# Altium PCB Power_Board-V1.0.PcbDoc (part 2 of 4)
Units mm, origin at the board's own origin, x right, y up, seen from the top; angles counter-clockwise.
Board outline 64.6 x 83.5 mm, 4 copper layers (Top Layer, GND1, GND2, Bottom Layer), stack 0.603 mm thick; 188 components, 131 nets, 487 pads, 123 vias.
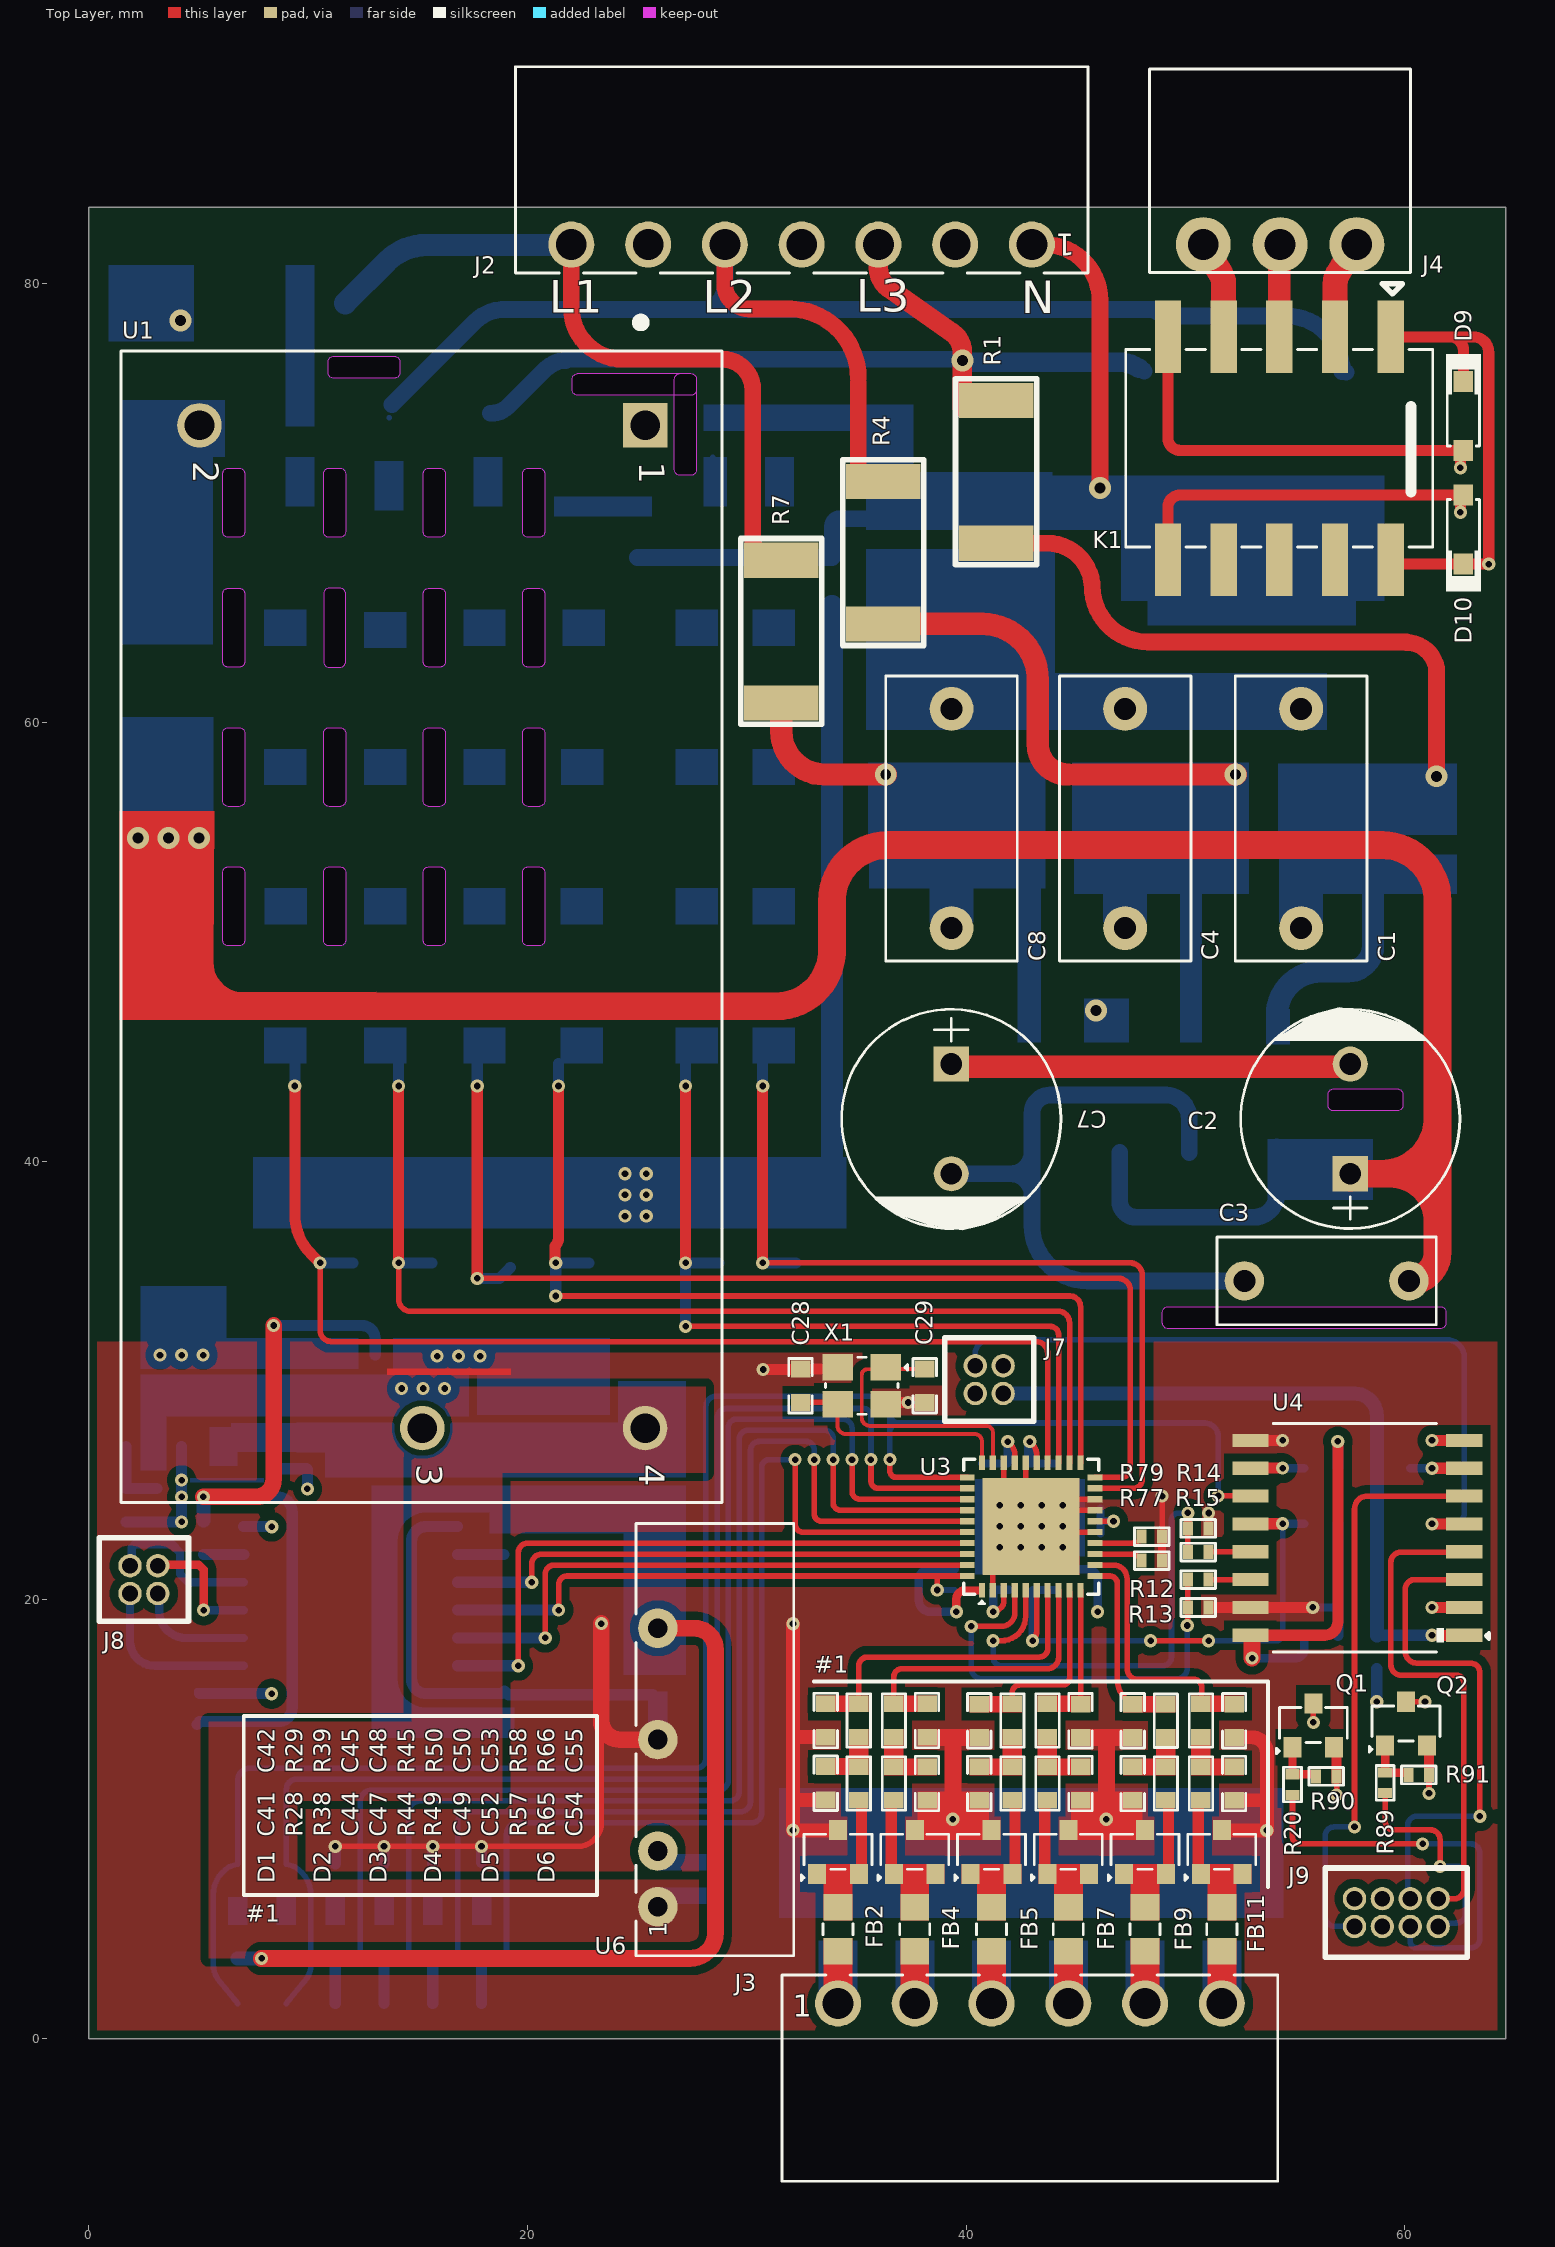
[diagram p0: Top Layer view]

## Part data (continued)
C63: library part GRM188Z71A475KE15D, "CAP CER 4.7UF 10V X7R 0603", Case/Package=0603, LCSC Part Number=C913474, Manufacturer=Murata, Max Operating Temperature=125°C, Min Operating Temperature=-55°C, Tolerance=10%, Voltage Rating=10V, ComponentLink1Description=https://datasheet.octopart.com/GRM188Z71A475KE15D-Murata-datasheet-149523299.pdf?src-supplier=Newark, ComponentLink1URL=https://datasheet.octopart.com/GRM188Z71A475KE15D-Murata-datasheet-149523299.pdf?src-supplier=Newark, ComponentLink2Description=https://datasheet.octopart.com/GRM188Z71A475KE15D-Murata-datasheet-165579666.pdf?src-supplier=TME, ComponentLink2URL=https://datasheet.octopart.com/GRM188Z71A475KE15D-Murata-datasheet-165579666.pdf?src-supplier=TME, Height=950um, Item Type=Capacitors, Length=1.6mm, Manufacturer Part Number=GRM188Z71A475KE15D, Material=4241ConductorMaterial, Pricing="1=0.24, 10=0.1, 50=0.1, 100=0.063, 1000=0.055, 10000=0.041 (USD)", RoHS=Yes, RoHS Compliant=Yes, Stock=33218, Supplier=Mouser, Thickness=800um, Width=800um
D1 D2 D3 D4 D5 D6: "DIODE ARR GP 100V 215MA TO-236AB", Breakdown Voltage=75V, Forward Current=125mA, Forward Voltage=1.25V, LCSC Part Number=C2500, Manufacturer=Nexperia, Max Forward Surge Current (Ifsm)=500mA, Max Operating Temperature=150°C, Max Repetitive Reverse Voltage (Vrrm)=100V, Max Reverse Current=500nA, ComponentLink1Description=http://www.farnell.com/datasheets/953882.pdf?src-supplier=Farnell, ComponentLink1URL=http://www.farnell.com/datasheets/953882.pdf?src-supplier=Farnell, ComponentLink2Description=http://www.farnell.com/datasheets/953882.pdf?src-supplier=Newark, ComponentLink2URL=http://www.farnell.com/datasheets/953882.pdf?src-supplier=Newark, ComponentLink3Description=https://datasheet.octopart.com/BAV99%2C215-Nexperia-datasheet-10109661.pdf?src-supplier=Element14, ComponentLink3URL=https://datasheet.octopart.com/BAV99%2C215-Nexperia-datasheet-10109661.pdf?src-supplier=Element14, ComponentLink4Description=https://assets.nexperia.com/documents/data-sheet/BAV99_SER.pdf?src-supplier=Digikey, ComponentLink4URL=https://assets.nexperia.com/documents/data-sheet/BAV99_SER.pdf?src-supplier=Digikey, ComponentLink5Description=https://datasheet.octopart.com/BAV99%2C215-Nexperia-datasheet-87580883.pdf?src-supplier=Newark, ComponentLink5URL=https://datasheet.octopart.com/BAV99%2C215-Nexperia-datasheet-87580883.pdf?src-supplier=Newark, Height=1.1mm, Item Type=Diodes, Manufacturer Part Number=BAV99,215, Pins=3NUMBER, Pricing="3000=0.008, 12000=0.0077, 30000=0.0075, 75000=0.0073, 120000=0.007 (USD)", Reverse Voltage=100V, RoHS=Yes, RoHS Compliant=Yes, Stock=20217000, Supplier="Future Electronics"
D9 D10: "DIODE SCHOTTKY 40V 1A SOD123", Average Rectified Current=1A, Capacitance=110pF, Case/Package=SOD-123-2, Forward Voltage=450mV, LCSC Part Number=C82544, Manufacturer=Diodes, Max Forward Surge Current (Ifsm)=25A, Max Operating Temperature=125°C, Max Power Dissipation=450mW, Max Repetitive Reverse Voltage (Vrrm)=40V, Max Reverse Current=50uA, Min Operating Temperature=-65°C, Package Quantity=3000, Supplier Part Number 1=1N5819HW-FDICT-ND, Category="Schottky Diodes", ComponentLink1Description=https://datasheet.ciiva.com/16303/ds30217-16303296.pdf?src-supplier=Future+Electronics, ComponentLink1URL=https://datasheet.ciiva.com/16303/ds30217-16303296.pdf?src-supplier=Future+Electronics, ComponentLink2Description=https://datasheet.ciiva.com/27092/1538419-27092484.pdf?src-supplier=Jameco, ComponentLink2URL=https://datasheet.ciiva.com/27092/1538419-27092484.pdf?src-supplier=Jameco, ComponentLink3Description=https://datasheet.ciiva.com/912/ds30217-912801.pdf?src-supplier=Digi-Key, ComponentLink3URL=https://datasheet.ciiva.com/912/ds30217-912801.pdf?src-supplier=Digi-Key, ComponentLink4Description=https://datasheet.ciiva.com/1177/ds30217-1177089.pdf?src-supplier=Element14, ComponentLink4URL=https://datasheet.ciiva.com/1177/ds30217-1177089.pdf?src-supplier=Element14, ComponentLink5Description=https://datasheet.ciiva.com/912/ds30217-912802.pdf?src-supplier=Digi-Key, ComponentLink5URL=https://datasheet.ciiva.com/912/ds30217-912802.pdf?src-supplier=Digi-Key, ComponentLink6Description=https://datasheet.ciiva.com/912/ds30217-912803.pdf?src-supplier=Digi-Key, ComponentLink6URL=https://datasheet.ciiva.com/912/ds30217-912803.pdf?src-supplier=Digi-Key, ComponentLink7Description=https://datasheet.ciiva.com/8303/ds30217-8303132.pdf?src-supplier=Avnet, ComponentLink7URL=https://datasheet.ciiva.com/8303/ds30217-8303132.pdf?src-supplier=Avnet, ComponentLink8Description=https://datasheet.ciiva.com/25919/ds30217-25919644.pdf?src-supplier=Avnet+Europe, ComponentLink8URL=https://datasheet.ciiva.com/25919/ds30217-25919644.pdf?src-supplier=Avnet+Europe, Contact Plating=Tin,Matte, Current Rating=1A, Element Configuration=Single, Forward Current=1A, Height=1.25mm, Item Type=Diode, Lead Free="Lead Free", Length=2.85mm, Manufacturer Part Number=1N5819HW-7-F, Max Reverse Voltage (DC)=40V, Number of Pins=2, Output Current=1A, Packaging="Tape and Reel", Peak Non-Repetitive Surge Current=25A, Polarity=Standard, Pricing 1="1=0.46000, 10=0.34500, 100=0.19530, 500=0.12936, 1000=0.09918 (USD)", Radiation Hardening=No, REACH SVHC="No SVHC", RoHS=Yes, RoHS Compliant=Yes, Series=-, Supplier 1=Digi-Key, Termination=SMD/SMT, Voltage Rating (DC)=40V, Weight=0.000353oz, Width=1.7mm
FB1 FB2 FB3 FB4 FB5 FB6 FB7 FB8 FB9 FB10 FB11 FB12 FB15: "FERRITE BEAD 1.5 KOHM 0805 1LN", Frequency=100MHz, LCSC Part Number=C413959, Manufacturer=Murata, RMS Current (Irms)=250mA, ComponentLink1Description=https://datasheet.ciiva.com/19454/1845267-19454720.pdf?src-supplier=Jameco, ComponentLink1URL=https://datasheet.ciiva.com/19454/1845267-19454720.pdf?src-supplier=Jameco, ComponentLink2Description=https://datasheet.ciiva.com/14122/amblm21b-data-e-14122891.pdf?src-supplier=Distrelec, ComponentLink2URL=https://datasheet.ciiva.com/14122/amblm21b-data-e-14122891.pdf?src-supplier=Distrelec, ComponentLink3Description=https://datasheet.ciiva.com/6211/l0110s0100blm21b-6211484.pdf?src-supplier=Digikey, ComponentLink3URL=https://datasheet.ciiva.com/6211/l0110s0100blm21b-6211484.pdf?src-supplier=Digikey, ComponentLink4Description=https://datasheet.ciiva.com/6211/l0110s0100blm21b-6211486.pdf?src-supplier=Digikey, ComponentLink4URL=https://datasheet.ciiva.com/6211/l0110s0100blm21b-6211486.pdf?src-supplier=Digikey, ComponentLink5Description=https://datasheet.ciiva.com/6211/l0110s0100blm21b-6211487.pdf?src-supplier=Digikey, ComponentLink5URL=https://datasheet.ciiva.com/6211/l0110s0100blm21b-6211487.pdf?src-supplier=Digikey, ComponentLink6Description=https://datasheet.ciiva.com/16420/l0110s0100blm21b-16420715.pdf?src-supplier=Future+Electronics, ComponentLink6URL=https://datasheet.ciiva.com/16420/l0110s0100blm21b-16420715.pdf?src-supplier=Future+Electronics, ComponentLink7Description=https://datasheet.ciiva.com/17277/l0110s0100blm21b-17277370.pdf?, ComponentLink7URL=https://datasheet.ciiva.com/17277/l0110s0100blm21b-17277370.pdf?, ESR=450mR, Item Type="Ferrite Beads", Lead Free=5697LeadFree, Manufacturer Part Number=BLM21BD152SN1D, Number of Circuits=1NUMBER, Pricing="1=0.21, 10=0.114, 50=0.114, 100=0.102, 1000=0.068, 10000=0.048 (USD)", RoHS=Yes, Shielding=202Shielding, Stock=31999, Supplier=Mouser
J1: "FUSE BLOK CARTRIDGE 125V 10A SMD", LCSC Part Number=C108518, Manufacturer=Littelfuse, ComponentLink1Description=https://datasheet.ciiva.com/3812/01550900m-3812998.pdf?src-supplier=Arrow+Electronics, ComponentLink1URL=https://datasheet.ciiva.com/3812/01550900m-3812998.pdf?src-supplier=Arrow+Electronics, Item Type="Fuse Holders", Lead Free=5697LeadFree, Manufacturer Part Number=01550900M, Pricing="1=2.5, 5=2.072, 10=1.912, 50=1.586, 100=1.4631, 250=1.31448, 500=1.21164, 1000=1.11633, 5000=1.06138 (USD)", Reach SVHC Compliant=4187SVHC, RoHS=Yes, Stock=4038, Supplier=Digikey
J2: "TERM BLOCK HDR 7POS 3.50MM", Manufacturer="Wurth Elektronik", ComponentLink1Description=https://datasheet.octopart.com:443/691322110007-Wurth-Elektronik-datasheet-111088189.pdf?src-supplier=RS+(Formerly+Allied+Electronics), ComponentLink1URL=https://datasheet.octopart.com:443/691322110007-Wurth-Elektronik-datasheet-111088189.pdf?src-supplier=RS+(Formerly+Allied+Electronics), Item Type="Terminal Blocks", Manufacturer Part Number=691322110007, Pricing="1=1.67, 10=1.517, 50=1.4248, 100=1.3032, 465=1.05841 (USD)", Stock=385, Supplier=DigiKey
J3: "TERM BLOCK HDR 6POS 3.50MM", Color=Green, Current=10A, Manufacturer="Wurth Elektronik", Supplier Part Number=732-2773-ND, Voltage=300V, ComponentLink1Description=https://datasheet.octopart.com:443/691322110006-W%C3%BCrth-Elektronik-datasheet-111088189.pdf?src-supplier=Farnell, ComponentLink1URL=https://datasheet.octopart.com:443/691322110006-W%C3%BCrth-Elektronik-datasheet-111088189.pdf?src-supplier=Farnell, ComponentLink2Description=https://datasheet.octopart.com:443/691322110006-W%C3%BCrth-Elektronik-datasheet-12532410.pdf?src-supplier=Farnell, ComponentLink2URL=https://datasheet.octopart.com:443/691322110006-W%C3%BCrth-Elektronik-datasheet-12532410.pdf?src-supplier=Farnell, ComponentLink3Description=https://datasheet.octopart.com:443/691322110006-W%C3%BCrth-Elektronik-Midcom-datasheet-10414363.pdf?src-supplier=Farnell, ComponentLink3URL=https://datasheet.octopart.com:443/691322110006-W%C3%BCrth-Elektronik-Midcom-datasheet-10414363.pdf?src-supplier=Farnell, ComponentLink4Description=https://datasheet.octopart.com:443/691322110006-W%C3%BCrth-Elektronik-Midcom-datasheet-10405066.pdf?src-supplier=Newark, ComponentLink4URL=https://datasheet.octopart.com:443/691322110006-W%C3%BCrth-Elektronik-Midcom-datasheet-10405066.pdf?src-supplier=Newark, Connector Type="PCB, Terminal Block", Contact Gender=Male, Contact Material=Brass, Gender=Male, Height=9.2mm, Item Type="Terminal Blocks", Lead Pitch=3.5mm, Length=10.5mm, Manufacturer Part Number=691322110006, Mounting Technology="Through Hole", Number of Contacts=6, Number of Levels=1, Number of Positions Per Level=6, Number of Rows=1, Packaging=Box, Pins=6, Pitch=3.5052mm, Pricing="1=1.19, 10=1.064, 50=0.9198, 100=0.8226, 250=0.77312, 560=0.7245 (USD)", RoHS=Compliant, Stock=1584, Supplier=DigiKey, Termination=Solder, Width=22.1mm
J4: "TERM BLOCK HDR 3POS 3.50MM", Color=Green, Current=10A, Manufacturer="Wurth Elektronik", Supplier Part Number=732-2770-ND, Voltage=300V, ComponentLink1Description=https://datasheet.octopart.com:443/691322110003-W%C3%BCrth-Elektronik-datasheet-111088189.pdf?src-supplier=Future+Electronics, ComponentLink1URL=https://datasheet.octopart.com:443/691322110003-W%C3%BCrth-Elektronik-datasheet-111088189.pdf?src-supplier=Future+Electronics, ComponentLink2Description=https://datasheet.octopart.com:443/691322110003-W%C3%BCrth-Elektronik-datasheet-12532410.pdf?src-supplier=Farnell, ComponentLink2URL=https://datasheet.octopart.com:443/691322110003-W%C3%BCrth-Elektronik-datasheet-12532410.pdf?src-supplier=Farnell, ComponentLink3Description=https://datasheet.octopart.com:443/691322110003-W%C3%BCrth-Elektronik-Midcom-datasheet-10414363.pdf?src-supplier=Farnell, ComponentLink3URL=https://datasheet.octopart.com:443/691322110003-W%C3%BCrth-Elektronik-Midcom-datasheet-10414363.pdf?src-supplier=Farnell, ComponentLink4Description=https://datasheet.octopart.com:443/691322110003-W%C3%BCrth-Elektronik-Midcom-datasheet-10405066.pdf?src-supplier=Newark, ComponentLink4URL=https://datasheet.octopart.com:443/691322110003-W%C3%BCrth-Elektronik-Midcom-datasheet-10405066.pdf?src-supplier=Newark, Contact Material=Brass, Gender=Male, Height=9.2mm, Item Type="Terminal Blocks", Lead Pitch=3.5mm, Length=10.5mm, Manufacturer Part Number=691322110003, Mounting Technology="Through Hole", Number of Contacts=3, Number of Levels=1, Number of Positions Per Level=3, Number of Rows=1, Packaging=Box, Pins=3, Pitch=3.5052mm, Pricing="1=0.66, 10=0.591, 50=0.5112, 100=0.4572, 250=0.4302, 750=0.4032 (USD)", RoHS=Compliant, Stock=11796, Supplier=DigiKey, Termination=Solder, Width=11.6mm
J7 J8 J9: "Socket Strip, Cuttable, Double Row, 0.050\"x0.050\" Pitch", Manufacturer=SAMTEC, CREATED="JUNE 03,  2014 - WENDY XIN", System=Connector
  J7 J8: PCB DECAL=FW-02-02-L-D-560-150, Supplier 1=Samtec
  J9: PCB DECAL=FW-04-02-L-D-560-150, Supplier 1=SAMTEC
K1: "RELAY TELECOM DPDT 500MA 5V", Ambient Temperature Range High=85°C, Coil Current=28mA, Coil Power=140mW, Coil Resistance=178Ω, Coil Voltage (DC)=3.75V, Contact Current Rating=2A, Contact Resistance=75mΩ, Contact Voltage Rating (AC)=125V, Insulation Resistance=1GΩ, LCSC Part Number=C2684450, Manufacturer=Panasonic, Max Operating Temperature=70°C, Max Voltage Rating (DC)=220V, Min Operating Temperature=-40°C, Coil Type="Latching, Dual Coil", ComponentLink1Description=https://datasheet.octopart.com:443/TQ2SA-L2-5V-Z-Panasonic-datasheet-138897391.pdf?src-supplier=Sager+Electronics, ComponentLink1URL=https://datasheet.octopart.com:443/TQ2SA-L2-5V-Z-Panasonic-datasheet-138897391.pdf?src-supplier=Sager+Electronics, ComponentLink2Description=https://datasheet.octopart.com:443/TQ2SA-L2-5V-Z-Panasonic-datasheet-34148902.pdf?src-supplier=IHS, ComponentLink2URL=https://datasheet.octopart.com:443/TQ2SA-L2-5V-Z-Panasonic-datasheet-34148902.pdf?src-supplier=IHS, ComponentLink3Description=https://datasheet.octopart.com:443/TQ2SA-L2-5V-Z-Panasonic-datasheet-110367.pdf?src-supplier=element14, ComponentLink3URL=https://datasheet.octopart.com:443/TQ2SA-L2-5V-Z-Panasonic-datasheet-110367.pdf?src-supplier=element14, ComponentLink4Description=https://datasheet.octopart.com:443/TQ2SA-L2-5V-Z-Panasonic-datasheet-8361856.pdf?src-supplier=Panasonic, ComponentLink4URL=https://datasheet.octopart.com:443/TQ2SA-L2-5V-Z-Panasonic-datasheet-8361856.pdf?src-supplier=Panasonic, ComponentLink5Description=https://datasheet.octopart.com:443/TQ2SA-L2-5V-Z-Panasonic-datasheet-11522959.pdf?src-supplier=Panasonic, ComponentLink5URL=https://datasheet.octopart.com:443/TQ2SA-L2-5V-Z-Panasonic-datasheet-11522959.pdf?src-supplier=Panasonic, ComponentLink6Description=https://datasheet.octopart.com:443/TQ2SA-L2-5V-Z-Panasonic-datasheet-136735749.pdf?src-supplier=Electro+Sonic, ComponentLink6URL=https://datasheet.octopart.com:443/TQ2SA-L2-5V-Z-Panasonic-datasheet-136735749.pdf?src-supplier=Electro+Sonic, ComponentLink7Description=https://datasheet.octopart.com:443/TQ2SA-L2-5V-Z-Panasonic-datasheet-27895613.pdf?src-supplier=Electro+Sonic, ComponentLink7URL=https://datasheet.octopart.com:443/TQ2SA-L2-5V-Z-Panasonic-datasheet-27895613.pdf?src-supplier=Electro+Sonic, ComponentLink8Description=https://datasheet.octopart.com:443/TQ2SA-L2-5V-Z-Panasonic-EW-datasheet-23711783.pdf?src-supplier=Electro+Sonic, ComponentLink8URL=https://datasheet.octopart.com:443/TQ2SA-L2-5V-Z-Panasonic-EW-datasheet-23711783.pdf?src-supplier=Electro+Sonic, ComponentLink9Description=https://datasheet.octopart.com:443/TQ2SA-L2-5V-Z-Panasonic-datasheet-152536022.pdf?src-supplier=Master+Electronics, ComponentLink9URL=https://datasheet.octopart.com:443/TQ2SA-L2-5V-Z-Panasonic-datasheet-152536022.pdf?src-supplier=Master+Electronics, ComponentLink10Description=https://datasheet.octopart.com:443/TQ2SA-L2-5V-Z-Panasonic-datasheet-30321.pdf?src-supplier=DigiKey, ComponentLink10URL=https://datasheet.octopart.com:443/TQ2SA-L2-5V-Z-Panasonic-datasheet-30321.pdf?src-supplier=DigiKey, ComponentLink11Description=https://datasheet.octopart.com:443/TQ2SA-L2-5V-Z-Panasonic-datasheet-10222392.pdf?src-supplier=Future+Electronics, ComponentLink11URL=https://datasheet.octopart.com:443/TQ2SA-L2-5V-Z-Panasonic-datasheet-10222392.pdf?src-supplier=Future+Electronics, Contact Material=Silver, Contact Plating=Gold, Current Rating=2A, Depth=11.5mm, Electrical Life=100kcycles, Height=5.4mm, Insertion Loss (dB)=0.8dB, Item Type="Signal Relays", Lead Free="Lead Free", Length=14mm, Lifecycle Status=Production, Manufacturer Part Number=TQ2SA-L2-5V-Z, Max Current Rating=2A, Max Voltage Rating (AC)=125V, Mounting Technology="Surface Mount", Number of Contacts=2, Number of Terminals=10, Operate Time=4ms, Packaging="Tape and Reel", Pins=10, Power Consumption=140mW, Pricing="37=2.711 (USD)", Radiation Hardening=No, REACH SVHC=Yes, Relay Type=Telecom, Release Time=4ms, Response Time=4ms, RoHS=Compliant, Stock=95, Supplier="Arrow Electronics", Switching Current=2A, Termination="Gull Wing", Throw Configuration=DPDT, Voltage Rating (AC)=125V, Voltage Rating (DC)=220V, Weight=2g, Width=9mm
L1 L2 L3 L4: library part XRNR6045-470uH/M, "420mA 470uH Magnetic Shielded Inductor ±20% 500mA 1.8Ω SMD,6x6mm Fixed Inductors ROHS", LCSC Part Number=C5339751, Manufacturer=XR, Package=SMD,6x6mm, Item Type=Inductor, Manufacturer Part Number=XRNR6045-470uH/M
LED1 LED2 LED3 LED4 LED5 LED6: library part NCD0603G2, "Emerald 0603 Light Emitting Diodes (LED) ROHS", LCSC Part Number=C87326, Manufacturer="Foshan NationStar Optoelectronics", Package=0603, ComponentLink1Description=LCSC, ComponentLink1URL=https://www.lcsc.com/product-detail/Light-Emitting-Diodes-LED_Foshan-NationStar-Optoelectronics-NCD0603G2_C87326.html, Item Type=LED, Manufacturer Part Number=NCD0603G2
Q1 Q2: "MOSFET BVDSS: 8V~24V SOT23 T&R 3", LCSC Part Number=C5157847, Manufacturer=Diodes, Item Type=MOSFETs, Manufacturer Part Number=DMG3420UQ-7, Pricing="1=0.45, 10=0.276, 100=0.1748, 500=0.1308, 1000=0.11658 (USD)", RoHS=Yes, RoHS Compliant=Yes, Stock=5879, Supplier=Digikey
R1 R4 R7: library part HoLRT2512-3W-1R-1, "3W 1Ω SMD ±50ppm/℃ Current Sense Resistor ±1% 2512 Chip Resistor - Surface Mount RoHS", LCSC Part Number=C5127857, Manufacturer=Milliohm, Package=2512, ComponentLink1Description=LCSC, ComponentLink1URL=https://www.lcsc.com/product-detail/C5127857.html, Item Type=Resistor, Manufacturer Part Number=HoLRT2512-3W-1R-1
R2 R5 R8 R9: library part AC1206FR-7W10KL, "RES 10K OHM 1% 1/2W 1206", Case/Package=340Case, LCSC Part Number=C326700, Manufacturer=Yageo, Item Type=Resistors, Manufacturer Part Number=AC1206FR-7W10KL, Packaging=10Packaging, Pricing="1=0.14, 10=0.052, 50=0.052, 100=0.029, 1000=0.018, 10000=0.011 (USD)", RoHS=No, Stock=10222, Supplier=Mouser
R3 R11: library part RC0603JR-070RL, "RES 0 OHM JUMPER 1/10W 0603", Case Code (Imperial)=0603, Case Code (Metric)=1608, LCSC Part Number=C95177, Manufacturer=Yageo, Max Operating Temperature=155°C, Max Power Dissipation=100mW, Min Operating Temperature=-55°C, Package Quantity=5000, Resistance=0mR, Resistance Tolerance=5%, Resistor Type="Thick Film", Supplier Part Number 1=311-0.0GRCT-ND, Temperature Coefficient=200ppm/°C, Tolerance=1%, Voltage Rating=50V, Case/Package=0603, Category="Chip SMD Resistors", Construction=Rectangular, Contact Plating=Tin,Matte, Depth=0.8mm, Features="Moisture Resistant", Height=0.45mm, Item Type=Resistor, Lead Free="Lead Free", Length=1.6mm, Manufacturer Part Number=RC0603JR-070RL, Military Standard=Not, Number of Pins=2, Number of Terminations=2, Packaging="Tape and Reel", Power Rating=100mW, Pricing 1="1=0.10000, 10=0.01700, 25=0.01240, 50=0.00960, 100=0.00700, 250=0.00536, 500=0.00430, 1000=0.00316 (USD)", Radiation Hardening=No, Reach SVHC Compliant="No SVHC", RoHS=Yes, RoHS Compliant=Yes, Series=RC, Size Code=0603, Stock 1=18081776, Supplier 1=Digi-Key, Technology="THICK FILM", Termination=SMD/SMT, Voltage Rating (DC)=50V, Width=0.8mm
R12 R15 R77 R79: library part RC0402FR-070RL, "RES 0 OHM JUMPER 1/16W 0402", Case Code (Imperial)=0402, Case Code (Metric)=1005, LCSC Part Number=C106231, Manufacturer=Yageo, Max Operating Temperature=155°C, Max Power Dissipation=63mW, Min Operating Temperature=-55°C, Power Rating=62.5mW, Resistor Type="Thick Film", Supplier Part Number 1=603-RC0402FR-070RL, Temperature Coefficient=200ppm/°C, Tolerance=1%, Voltage Rating=50V, Case/Package=0402, ComponentLink1Description=https://datasheet.ciiva.com/8896/pyu-rc0402-51-rohs-l-6-8896149.pdf?src-supplier=Avnet, ComponentLink1URL=https://datasheet.ciiva.com/8896/pyu-rc0402-51-rohs-l-6-8896149.pdf?src-supplier=Avnet, ComponentLink2Description=https://datasheet.ciiva.com/16790/pyu-rc0402-51-rohs-l-6-r-16790444.pdf?src-supplier=Future+Electronics, ComponentLink2URL=https://datasheet.ciiva.com/16790/pyu-rc0402-51-rohs-l-6-r-16790444.pdf?src-supplier=Future+Electronics, Contact Plating=Tin,Matte, Features="Moisture Resistant", Height=0.35mm, Item Type=Resistors, Lead Free="Lead Free", Length=1mm, Manufacturer Part Number=RC0402FR-070RL, Mount="Surface Mount", Number of Terminations=2, Packaging="Tape and Reel", Pricing 1="1=0.10000, 10=0.01400, 50=0.01400, 100=0.00600, 1000=0.00300, 5000=0.00200, 10000=0.00100 (USD)", Radiation Hardening=No, Resistance=0R, RoHS=Yes, RoHS Compliant=Yes, Series=RC, Size Code=0402, Stock 1=8556842, Supplier 1=Mouser, Termination=SMD/SMT, Width=0.5mm
R13 R14: library part RC0402FR-070RL, "RES 0 OHM JUMPER 1/16W 0402", Case Code (Imperial)=0402, Case Code (Metric)=1005, LCSC Part Number=C106231, Manufacturer=Yageo, Max Operating Temperature=155°C, Max Power Dissipation=63mW, Min Operating Temperature=-55°C, Power Rating=62.5mW, Resistance=0R, Resistor Type="Thick Film", Supplier Part Number 1=603-RC0402FR-070RL, Temperature Coefficient=200ppm/°C, Tolerance=1%, Voltage Rating=50V, Case/Package=0402, ComponentLink1Description=https://datasheet.ciiva.com/8896/pyu-rc0402-51-rohs-l-6-8896149.pdf?src-supplier=Avnet, ComponentLink1URL=https://datasheet.ciiva.com/8896/pyu-rc0402-51-rohs-l-6-8896149.pdf?src-supplier=Avnet, ComponentLink2Description=https://datasheet.ciiva.com/16790/pyu-rc0402-51-rohs-l-6-r-16790444.pdf?src-supplier=Future+Electronics, ComponentLink2URL=https://datasheet.ciiva.com/16790/pyu-rc0402-51-rohs-l-6-r-16790444.pdf?src-supplier=Future+Electronics, Contact Plating=Tin,Matte, Features="Moisture Resistant", Height=0.35mm, Item Type=Resistors, Lead Free="Lead Free", Length=1mm, Manufacturer Part Number=RC0402FR-070RL, Mount="Surface Mount", Number of Terminations=2, Packaging="Tape and Reel", Pricing 1="1=0.10000, 10=0.01400, 50=0.01400, 100=0.00600, 1000=0.00300, 5000=0.00200, 10000=0.00100 (USD)", Radiation Hardening=No, RoHS=Yes, RoHS Compliant=Yes, Series=RC, Size Code=0402, Stock 1=8556842, Supplier 1=Mouser, Termination=SMD/SMT, Width=0.5mm
R16 R17: library part RC0402FR-0710KL, "RES 10K OHM 1% 1/16W 0402", Case Code (Imperial)=0402, Case Code (Metric)=1005, LCSC Part Number=C60490, Manufacturer=Yageo, Max Operating Temperature=155°C, Max Power Dissipation=63mW, Min Operating Temperature=-55°C, Power Rating=62.5mW, Resistance=10kR, Resistance Tolerance=1%, Resistor Type="Thick Film", Supplier Part Number 1=603-RC0402FR-0710KL, Temperature Coefficient=100ppm/°C, Voltage Rating=50V, Case/Package=0402, Category="Chip SMD Resistors", ComponentLink1Description=https://datasheet.ciiva.com/7660/38568-7660787.pdf?src-supplier=Element14, ComponentLink1URL=https://datasheet.ciiva.com/7660/38568-7660787.pdf?src-supplier=Element14, ComponentLink2Description=https://datasheet.ciiva.com/7849/1686128-7849814.pdf?src-supplier=Element14, ComponentLink2URL=https://datasheet.ciiva.com/7849/1686128-7849814.pdf?src-supplier=Element14, ComponentLink3Description=https://datasheet.ciiva.com/7983/1018594-7983486.pdf?src-supplier=Element14, ComponentLink3URL=https://datasheet.ciiva.com/7983/1018594-7983486.pdf?src-supplier=Element14, ComponentLink4Description=https://datasheet.ciiva.com/22747/1018594-22747512.pdf?src-supplier=Element14, ComponentLink4URL=https://datasheet.ciiva.com/22747/1018594-22747512.pdf?src-supplier=Element14, ComponentLink5Description=https://datasheet.ciiva.com/12667/pyu-rc0402-51-rohs-l-6-r-12667067.pdf?src-supplier=Mouser, ComponentLink5URL=https://datasheet.ciiva.com/12667/pyu-rc0402-51-rohs-l-6-r-12667067.pdf?src-supplier=Mouser, ComponentLink6Description=https://datasheet.ciiva.com/7849/1784430-7849813.pdf?src-supplier=Element14, ComponentLink6URL=https://datasheet.ciiva.com/7849/1784430-7849813.pdf?src-supplier=Element14, ComponentLink7Description=https://datasheet.ciiva.com/7849/1784430-7849815.pdf?src-supplier=Element14, ComponentLink7URL=https://datasheet.ciiva.com/7849/1784430-7849815.pdf?src-supplier=Element14, Construction=Rectangular, Depth=0.5mm, Features="Moisture Resistant", Height=0.32mm, Item Type=Resistor, Lead Free="Lead Free", Lead Pitch=0.2mm, Length=1mm, Manufacturer Part Number=RC0402FR-0710KL, Military Standard=Not, Number of Pins=2, Number of Terminations=2, Packaging="Tape and Reel", Pricing 1="1=0.10000, 10=0.01400, 50=0.01400, 100=0.00500, 1000=0.00300, 10000=0.00200 (USD)", REACH SVHC="No SVHC", RoHS=Yes, RoHS Compliant=Yes, Series=RC, Stock 1=18648329, Supplier 1=Mouser, Termination=SMD/SMT, Tolerance=1%, Voltage Rating (DC)=50V, Width=0.5mm, Working Voltage=50V
R18 R19 R21 R22: library part RC0603FR-074K7L, "RES SMD 4.7K OHM 1% 1/10W 0603", LCSC Part Number=C99782, Manufacturer=Yageo, Package=0603, ComponentLink7Description=LCSC, ComponentLink7URL=https://www.lcsc.com/product-detail/Chip-Resistor-Surface-Mount_YAGEO-RC0603FR-074K7L_C99782.html, Item Type=Resistor, Manufacturer Part Number=RC0603FR-074K7L
R20 R89: library part RC0402FR-071KL, "RES 1K OHM 1% 1/16W 0402", Case Code (Imperial)=0402, Case Code (Metric)=1005, LCSC Part Number=C106235, Manufacturer=Yageo, Max Operating Temperature=155°C, Max Power Dissipation=63mW, Min Operating Temperature=-55°C, Power Rating=62.5mW, Resistance=1kR, Resistance Tolerance=1%, Resistor Type="Thick Film", Temperature Coefficient=100ppm/°C, Voltage Rating=50V, Case/Package=0402, Category="Chip SMD Resistors", ComponentLink1Description=https://datasheet.ciiva.com/11819/0900766b80c66297-11819477.pdf?src-supplier=RSComponents, ComponentLink1URL=https://datasheet.ciiva.com/11819/0900766b80c66297-11819477.pdf?src-supplier=RSComponents, ComponentLink2Description=https://datasheet.ciiva.com/7983/1018594-7983502.pdf?src-supplier=Element14, ComponentLink2URL=https://datasheet.ciiva.com/7983/1018594-7983502.pdf?src-supplier=Element14, ComponentLink3Description=https://datasheet.ciiva.com/22747/1018594-22747513.pdf?src-supplier=Element14, ComponentLink3URL=https://datasheet.ciiva.com/22747/1018594-22747513.pdf?src-supplier=Element14, ComponentLink4Description=https://datasheet.ciiva.com/12666/pyu-rc0402-51-rohs-l-6-r-12666741.pdf?src-supplier=Mouser, ComponentLink4URL=https://datasheet.ciiva.com/12666/pyu-rc0402-51-rohs-l-6-r-12666741.pdf?src-supplier=Mouser, ComponentLink5Description=https://datasheet.ciiva.com/7849/1018594-7849869.pdf?src-supplier=Element14, ComponentLink5URL=https://datasheet.ciiva.com/7849/1018594-7849869.pdf?src-supplier=Element14, ComponentLink6Description=https://datasheet.ciiva.com/7849/1018594-7849871.pdf?src-supplier=Element14, ComponentLink6URL=https://datasheet.ciiva.com/7849/1018594-7849871.pdf?src-supplier=Element14, ComponentLink7Description=https://datasheet.ciiva.com/17063/pyu-rc0402-51-rohs-l-6-r-17063193.pdf?src-supplier=Future+Electronics, ComponentLink7URL=https://datasheet.ciiva.com/17063/pyu-rc0402-51-rohs-l-6-r-17063193.pdf?src-supplier=Future+Electronics, Construction=Rectangular, Depth=0.5mm, Features="Moisture Resistant", Height=0.32mm, Item Type=Resistor, Lead Free="Lead Free", Length=1mm, Manufacturer Part Number=RC0402FR-071KL, Military Standard=Not, Number of Pins=2, Number of Terminations=2, Packaging="Tape and Reel", Pricing 1="10000=0.00085, 20000=0.00087, 40000=0.00084, 60000=0.00083, 80000=0.00079, 100000=0.00078, 1000000=0.00076 (USD)", Reach SVHC Compliant=Yes, RoHS=Yes, RoHS Compliant=Yes, Series=RC, Size Code=0402, Stock 1=13030000, Supplier 1=Avnet, Supplier Part Number 1=RC0402FR-071KL, Technology="THICK FILM", Termination=SMD/SMT, Tolerance=1%, Voltage Rating (DC)=50V, Width=0.5mm
R23 R24 R25 R26 R32 R33 R34 R35 R40 R41 R42 R43 R52 R53 R54 R55 R61 R62 R63 R64 R69 R70 R71 R72: library part "FRC2010J204 TS", "0.75W Thick Film Resistors 200V ±100ppm/℃ ±5% 200kΩ 2010 Chip Resistor - Surface Mount ROHS", LCSC Part Number=C2960872, Manufacturer=FOJAN, Package=2010, ComponentLink1Description=LCSC, ComponentLink1URL=https://www.lcsc.com/product-detail/Chip-Resistor-Surface-Mount_FOJAN-FRC2010J204-TS_C2960872.html?s_z=n_CRCW2010200KJNEF, Item Type=Resistor, Manufacturer Part Number="FRC2010J204 TS"
R27 R36 R46 R56 R67 R73: library part HP101WJ0102T4E, "1W 1kΩ 300V ±100ppm/℃ Thick Film Resistor ±5% 2010 Chip Resistor - Surface Mount RoHS", LCSC Part Number=C2758967, Manufacturer=UNI-ROYAL, Package=2010, ComponentLink1Description=LCSC, ComponentLink1URL=https://www.lcsc.com/product-detail/C2758967.html, Item Type=Resistor, Manufacturer Part Number=HP101WJ0102T4E
R28 R38 R44 R49 R57 R65: library part RC0603FR-070RL, "RES SMD 0R, 1%, 0.1W, 0603", LCSC Part Number=C100044, Manufacturer=Yageo, Package=0603, ComponentLink9Description=LCSC, ComponentLink9URL=https://www.lcsc.com/product-detail/Chip-Resistor-Surface-Mount_YAGEO-RC0603FR-070RL_C100044.html, Item Type=Resistor, Manufacturer Part Number=RC0603FR-070RL
R29 R39 R45 R50 R58 R66: library part RC0603FR-071KL, "RES SMD 1K OHM 1% 1/10W 0603", Case Code (Imperial)=0603, Case Code (Metric)=1608, LCSC Part Number=C22548, Manufacturer=Yageo, Max Operating Temperature=155°C, Min Operating Temperature=-55°C, Power Rating=100mW, Resistance=1kR, Supplier Part Number 1=311-1.00KHRDKR-ND, Temperature Coefficient=100ppm/°C, Tolerance=1%, Voltage Rating=50V, Case/Package=0603, ComponentLink1Description=https://www.verical.com/server-webapp/html/getDatasheet?partID=409289&src-supplier=Verical, ComponentLink1URL=https://www.verical.com/server-webapp/html/getDatasheet?partID=409289&src-supplier=Verical, ComponentLink2Description=http://documents.rs-components.com/techlib://itc_doclist_GB.htm?stockno=5048928&src-supplier=RSComponents, ComponentLink2URL=http://documents.rs-components.com/techlib://itc_doclist_GB.htm?stockno=5048928&src-supplier=RSComponents, ComponentLink3Description=http://www.yageo.com/documents/recent/PYu-RC0603_51_RoHS_L_4.pdf?src-supplier=Avnet+Europe, ComponentLink3URL=http://www.yageo.com/documents/recent/PYu-RC0603_51_RoHS_L_4.pdf?src-supplier=Avnet+Europe, ComponentLink4Description=http://www.farnell.com/datasheets/2167052.pdf?src-supplier=Element14, ComponentLink4URL=http://www.farnell.com/datasheets/2167052.pdf?src-supplier=Element14, ComponentLink5Description=http://www.farnell.com/datasheets/1868787.pdf?src-supplier=Element14, ComponentLink5URL=http://www.farnell.com/datasheets/1868787.pdf?src-supplier=Element14, ComponentLink6Description=http://www.yageo.com/documents/recent/PYu-RC_Group_51_RoHS_L_2.pdf?src-supplier=Avnet, ComponentLink6URL=http://www.yageo.com/documents/recent/PYu-RC_Group_51_RoHS_L_2.pdf?src-supplier=Avnet, ComponentLink7Description=https://www.verical.com/server-webapp/html/getDatasheet?partID=404327&src-supplier=Verical, ComponentLink7URL=https://www.verical.com/server-webapp/html/getDatasheet?partID=404327&src-supplier=Verical, ComponentLink8Description=http://www.farnell.com/datasheets/443971.pdf?src-supplier=Element14, ComponentLink8URL=http://www.farnell.com/datasheets/443971.pdf?src-supplier=Element14, Composition="Thick Film", Contact Plating=Tin,Matte, Depth=0.8mm, Height=0.45mm, Item Type=Resistor, Lead Free="Lead Free", Length=1.6mm, Manufacturer Part Number=RC0603FR-071KL, Military Standard=Not, Packaging="Tape and Reel", Pricing 1="1=0.1, 10=0.023, 100=0.0094, 1000=0.0042, 2500=0.0037 (USD)", Radiation Hardening=No, REACH SVHC="No SVHC", Stock 1=21472395, Supplier 1=Digi-Key, Termination=SMD/SMT
R30 R37 R47 R48 R59 R60: library part RC1206JR-075R1L, "RES 5.1 OHM 5% 1/4W 1206", LCSC Part Number=C163357, Manufacturer=Yageo, Supplier Part Number=2133981, Category="Chip SMD Resistors", ComponentLink1Description=https://datasheet.ciiva.com/2459/pyu-r-int-thick-7-2459118.pdf?src-supplier=Digikey, ComponentLink1URL=https://datasheet.ciiva.com/2459/pyu-r-int-thick-7-2459118.pdf?src-supplier=Digikey, ComponentLink2Description=https://datasheet.ciiva.com/2459/pyu-r-int-thick-7-2459119.pdf?src-supplier=Digikey, ComponentLink2URL=https://datasheet.ciiva.com/2459/pyu-r-int-thick-7-2459119.pdf?src-supplier=Digikey, ComponentLink3Description=https://datasheet.ciiva.com/2459/pyu-r-int-thick-7-2459120.pdf?src-supplier=Digikey, ComponentLink3URL=https://datasheet.ciiva.com/2459/pyu-r-int-thick-7-2459120.pdf?src-supplier=Digikey, Item Type=Resistor, Manufacturer Part Number=RC1206JR-075R1L, Pricing="5000=0.0086, 25000=0.0082, 125000=0.0078, 250000=0.0076, 750000=0.0071 (USD)", RoHS=Yes, Stock=30000, Supplier="Future Electronics"
R83 R84 R85 R86 R87 R88: library part RC0603FR-07680RL, "RES SMD 680 OHM 1% 1/10W 0603", LCSC Part Number=C112310, Manufacturer=Yageo, Package=0603, ComponentLink4Description=LCSC, ComponentLink4URL=https://www.lcsc.com/product-detail/Chip-Resistor-Surface-Mount_YAGEO-RC0603FR-07680RL_C112310.html, Item Type=Resistor, Manufacturer Part Number=RC0603FR-07680RL
R90 R91: library part RC0402FR-07100KL, "RES 100K OHM 1% 1/16W 0402", Case Code (Imperial)=0402, Case Code (Metric)=1005, LCSC Part Number=C60491, Manufacturer=Yageo, Max Operating Temperature=155°C, Max Power Dissipation=63mW, Min Operating Temperature=-55°C, Package Quantity=1, Resistance=100kR, Resistance Tolerance=1%, Resistor Type="Thick Film", Supplier Part Number 1=603-RC0402FR-07100KL, Temperature Coefficient=100ppm/°C, Voltage Rating=50V, Case/Package=0402, Category="Chip SMD Resistors", ComponentLink1Description=https://datasheet.ciiva.com/11819/0900766b80c66297-11819452.pdf?src-supplier=RSComponents, ComponentLink1URL=https://datasheet.ciiva.com/11819/0900766b80c66297-11819452.pdf?src-supplier=RSComponents, ComponentLink2Description=https://datasheet.ciiva.com/22747/1018594-22747509.pdf?src-supplier=Element14, ComponentLink2URL=https://datasheet.ciiva.com/22747/1018594-22747509.pdf?src-supplier=Element14, ComponentLink3Description=https://datasheet.ciiva.com/2453/pyu-r-int-thick-7-2453362.pdf?src-supplier=Digi-Key, ComponentLink3URL=https://datasheet.ciiva.com/2453/pyu-r-int-thick-7-2453362.pdf?src-supplier=Digi-Key, ComponentLink4Description=https://datasheet.ciiva.com/2453/pyu-r-int-thick-7-2453363.pdf?src-supplier=Digi-Key, ComponentLink4URL=https://datasheet.ciiva.com/2453/pyu-r-int-thick-7-2453363.pdf?src-supplier=Digi-Key, ComponentLink5Description=https://datasheet.ciiva.com/2453/pyu-r-int-thick-7-2453361.pdf?src-supplier=Digi-Key, ComponentLink5URL=https://datasheet.ciiva.com/2453/pyu-r-int-thick-7-2453361.pdf?src-supplier=Digi-Key, ComponentLink6Description=https://datasheet.ciiva.com/12667/pyu-rc0402-51-rohs-l-6-r-12667930.pdf?src-supplier=Mouser, ComponentLink6URL=https://datasheet.ciiva.com/12667/pyu-rc0402-51-rohs-l-6-r-12667930.pdf?src-supplier=Mouser, ComponentLink7Description=https://datasheet.ciiva.com/15189/getdatasheetpartid-323696-15189334.pdf?src-supplier=Verical, ComponentLink7URL=https://datasheet.ciiva.com/15189/getdatasheetpartid-323696-15189334.pdf?src-supplier=Verical, Construction=Rectangular, Depth=0.5mm, Features="Moisture Resistant", Height=0.016inch, Item Type=Resistor, Lead Free="Lead Free", Length=0.039inch, Manufacturer Part Number=RC0402FR-07100KL, Military Standard=Not, Number of Terminations=2, Packaging="Tape and Reel", Power Rating=63mW, Pricing 1="1=0.10000, 10=0.01200, 50=0.01200, 100=0.00500, 1000=0.00300, 2500=0.00200, 10000=0.00100 (USD)", REACH SVHC="No SVHC", RoHS=Yes, RoHS Compliant=Yes, Series=RC, Stock 1=7759549, Supplier 1=Mouser, Technology="THICK FILM", Termination=SMD/SMT, Tolerance=1%, Width=0.02inch, Working Voltage=50V
SB1: "Solder Bridge ON", Manufacturer Part Number="Solder Bridge", Item Type="Solder Bridge"
TP1 TP2 TP3 TP4 TP5 TP6: "Test Point ON", Item Type="TEST POINT"
U1: "AC/DC CONVERTER 5V 5W", Manufacturer="Recom Power", Max Operating Temperature=60°C, Max Output Current=1A, Max Output Power=5W, Max Output Voltage=5.05V, Max Supply Voltage=528V, Min Input Voltage=85V, Min Operating Temperature=-40°C, Min Output Voltage=4.95V, Nominal Output Voltage=5V, Nominal Supply Voltage=480V, Supplier Part Number=945-3185-ND, Approvals="CE, EN, IEC, UL", ComponentLink1Description=https://datasheet.octopart.com:443/RAC05-05SK-480-Recom-Power-datasheet-181184451.pdf?src-supplier=IHS, ComponentLink1URL=https://datasheet.octopart.com:443/RAC05-05SK-480-Recom-Power-datasheet-181184451.pdf?src-supplier=IHS, ComponentLink2Description=https://datasheet.octopart.com:443/RAC05-05SK-480-Recom-Power-datasheet-133924410.pdf?src-supplier=Farnell, ComponentLink2URL=https://datasheet.octopart.com:443/RAC05-05SK-480-Recom-Power-datasheet-133924410.pdf?src-supplier=Farnell, ComponentLink3Description=https://datasheet.octopart.com:443/RAC05-05SK-480-Recom-Power-datasheet-148822129.pdf?src-supplier=Electro+Sonic, ComponentLink3URL=https://datasheet.octopart.com:443/RAC05-05SK-480-Recom-Power-datasheet-148822129.pdf?src-supplier=Electro+Sonic, ComponentLink4Description=https://datasheet.octopart.com:443/RAC05-05SK-480-Recom-Power-datasheet-138144762.pdf?src-supplier=RS+(Formerly+Allied+Electronics), ComponentLink4URL=https://datasheet.octopart.com:443/RAC05-05SK-480-Recom-Power-datasheet-138144762.pdf?src-supplier=RS+(Formerly+Allied+Electronics), ComponentLink5Description=https://datasheet.octopart.com:443/RAC05-05SK-480-Recom-Power-datasheet-165581948.pdf?src-supplier=TME, ComponentLink5URL=https://datasheet.octopart.com:443/RAC05-05SK-480-Recom-Power-datasheet-165581948.pdf?src-supplier=TME, Efficiency=63%, Height=23mm, Height - Seated (Max)=23.5mm, Item Type="Voltage Regulators - Switching", Length=52.5mm, Lifecycle Status=Production, Manufacturer Part Number=RAC05-05SK/480, Number of Circuits=1, Number of Outputs=1, Number of Terminals=4, Output Current=1A, Output Power=5W, Output Voltage=5V, Pricing="1=18.3, 5=17.424, 10=17.063, 25=16.596, 50=16.251, 100=15.9134, 250=15.47772, 500=15.15614 (USD)", REACH SVHC=Yes, RoHS=Compliant, Schedule B=8504409580, Stock=856, Supplier=DigiKey, Weight=58g, Width=27.4mm
U2: "IC REG LINEAR 3.3V 1A SOT223-6", LCSC Part Number=C485803, Manufacturer="Texas Instruments", Supplier Part Number=595-TPS79633DCQR, Category="Voltage Regulators - Linear", ComponentLink1Description=https://datasheet.ciiva.com/2045/tps79601-2045264.pdf?src-supplier=Digi-Key, ComponentLink1URL=https://datasheet.ciiva.com/2045/tps79601-2045264.pdf?src-supplier=Digi-Key, ComponentLink2Description=https://datasheet.ciiva.com/22704/1846966-22704703.pdf?src-supplier=Element14, ComponentLink2URL=https://datasheet.ciiva.com/22704/1846966-22704703.pdf?src-supplier=Element14, ComponentLink3Description=https://datasheet.ciiva.com/41462/001015136-da-01-en-ic-reg-ldo-3-3v-1-tps79633dcqr-sot-6-tid-41462982.pdf?src-supplier=Conrad, ComponentLink3URL=https://datasheet.ciiva.com/41462/001015136-da-01-en-ic-reg-ldo-3-3v-1-tps79633dcqr-sot-6-tid-41462982.pdf?src-supplier=Conrad, Item Type=IC, Length=6.5mm, Manufacturer Part Number=TPS79633DCQR, Pricing="1=3.24, 10=2.75, 50=2.75, 100=2.39, 1000=1.72, 10000=1.56 (USD)", RoHS=Yes, Stock=3089, Supplier=Mouser, Thickness=1.6mm, Width=3.5mm
U3: "IC AFE 7 CHAN 40LFCSP-WQ", Manufacturer="Analog Devices", Supplier Part Number=584-ADE9000ACPZ, ComponentLink1Description=http://www.farnell.com/datasheets/2280571.pdf?src-supplier=Farnell, ComponentLink1URL=http://www.farnell.com/datasheets/2280571.pdf?src-supplier=Farnell, ComponentLink2Description=https://datasheet.octopart.com/ADE9000ACPZ-Analog-Devices-datasheet-165826959.pdf?src-supplier=Element14, ComponentLink2URL=https://datasheet.octopart.com/ADE9000ACPZ-Analog-Devices-datasheet-165826959.pdf?src-supplier=Element14, ComponentLink3Description=https://www.analog.com/media/en/technical-documentation/data-sheets/ADE9000.pdf?src-supplier=Digikey, ComponentLink3URL=https://www.analog.com/media/en/technical-documentation/data-sheets/ADE9000.pdf?src-supplier=Digikey, Item Type=IC, Manufacturer Part Number=ADE9000ACPZ, Pricing="1=18.44, 10=13.35, 50=10.79, 100=10.79, 1000=10.52, 10000=10.52 (USD)", RoHS=Yes, Stock=7889, Supplier=Mouser
U4 U5: "DGTL ISO 5000VRMS 4CH GP 16SOIC", Case/Package=SOIC, Isolated Power=No, LCSC Part Number=C571196, Manufacturer="Texas Instruments", Max Operating Temperature=125°C, Min Operating Temperature=-55°C, Channel Type=Unidirectional, ComponentLink1Description=http://www.ti.com/lit/ds/symlink/iso7741.pdf?src-supplier=Digikey, ComponentLink1URL=http://www.ti.com/lit/ds/symlink/iso7741.pdf?src-supplier=Digikey, ComponentLink2Description=http://www.ti.com/general/docs/suppproductinfo.tsp?distId=10&amp;gotoUrl=http%3A%2F%2Fwww.ti.com%2Flit%2Fgpn%2Fiso7741&src-supplier=Digikey, ComponentLink2URL=http://www.ti.com/general/docs/suppproductinfo.tsp?distId=10&amp;gotoUrl=http%3A%2F%2Fwww.ti.com%2Flit%2Fgpn%2Fiso7741&src-supplier=Digikey, Data Rate=100Mbps, Item Type=IC, Lead Free="Lead Free", Manufacturer Part Number=ISO7741DWR, Mounting Technology="Surface Mount", Number of Channels=4, Packaging="Cut Tape", Pins=16, Pricing="1=2.32, 10=1.36, 50=1.36, 100=1.29, 1000=1.22, 10000=1.1 (USD)", Propagation Delay=16ns, Pulse Width Distortion (PWD)=4.9ns, RoHS=Yes, RoHS Compliant=Yes, Series=-, Stock=8750, Supplier=Mouser, Type="General Purpose"
U6: "SIP-4 Isolated Power Modules ROHS", LCSC Part Number=C5369472, Manufacturer=YLPTEC, Package=SIP-4, ComponentLink1Description=LCSC, ComponentLink1URL=https://www.lcsc.com/product-detail/Isolated-Power-Modules_YLPTEC-B0503S-2WR3_C5369472.html?s_z=n_B0503S-2WR3, Item Type=Module, Manufacturer Part Number=B0503S-2WR3
VR1 VR2 VR3: "710V 350V 275V Through Hole,P=10mm Varistors ROHS", LCSC Part Number=C2839534, Manufacturer=SURGING, Package="Through Hole,P=10mm", ComponentLink1Description=LCSC, ComponentLink1URL=https://www.lcsc.com/product-detail/C2839534.html, Item Type=Varistor, Manufacturer Part Number=20D431K
X1: library part X322524576MOB4SI, "24.576MHz Surface Mount Crystal 12pF ±10ppm ±20ppm SMD3225-4P Crystals ROHS", LCSC Part Number=C70568, Manufacturer=YXC, ComponentLink1Description=LCSC, ComponentLink1URL=https://www.lcsc.com/product-detail/Crystals_YXC-Crystal-Oscillators-X322524576MOB4SI_C70568.html?s_z=n_X322524576MOB4SI, Item Type=Crystal, Manufacturer Part Number=X322524576MOB4SI, RoHS=No, Supplier=LCSC

## Via types
v1: diameter 0.6, hole 0.3, Top Layer to Bottom Layer, tented both sides, 113 vias
v2: diameter 1, hole 0.5, Top Layer to Bottom Layer, tented both sides, 10 vias

## Nets (pads, with @x,y where several pads share a name; then routed paths per layer and width w, separated by ;. In a path a pad name is that pad's centre, name@x,y a point inside that pad or via, vN(x,y) a via of type N, cw(c..) or ccw(c..) an arc to the next point about the centre after c; other vN are vias at no path point)
3V3-ISO: C16.2 C31.2 C38.2 C39.2 C63.2 R19.2 R22.2 R87.2 R88.2 U3.27 U4.16 U5.16 U6.6 | length 135
  Top Layer w0.254: v1@42.1,27.001 cw(c41.533,26.62) 42.216,26.62 U3.27@42.216,26.247
  Top Layer w0.508: U4.16@52.96,18.387 56.327,18.387 ccw(c56.327,19.006) 56.946,19.006 v1(56.946,27.227)
  Top Layer w0.762: v1(7.874,3.655) 27.404,3.655 ccw(c27.404,4.826) 28.575,4.826 28.575,17.739 ccw(c27.603,17.739) 27.603,18.711 U6.6@25.944,18.711 ; v1(53.035,17.348) U4.16@53.035,18.142
  GND2 w0.254: U6.6@25.944,18.711 28.448,18.711 ccw(c28.448,19.415) 29.151,19.415 29.151,27.118 cw(c30.024,27.118) 30.024,27.991 41.456,27.991 ; v1(41.899,27.22) 41.899,27.548 ; 41.899,27.929 41.899,27.548 ; v1(56.946,27.227) 56.926,27.247 ccw(c55.13,25.451) 55.13,27.991 42.342,27.991 ; 41.456,27.991 cw(c41.456,27.548) 41.899,27.548 ; 41.456,27.991 42.342,27.991 ; 41.899,27.548 cw(c42.342,27.548) 42.342,27.991
  Bottom Layer w0.254: U5.16@16.811,14.457 14.36,14.457 cw(c14.36,15.023) 13.793,15.023 13.793,24.109 cw(c14.424,24.109) 14.424,24.74 18.44,24.74 cw(c18.44,24.257) 18.923,24.257 R22.2@18.923,23.601 25.294,23.601 cw(c25.294,22.987) 25.908,22.987 25.908,18.747 ccw(c25.944,18.747) U6.6@25.944,18.711 ; C31.2@18.821,14.462 C31.2@18.953,14.33 ; R19.2@56.946,26.032 R19.2@56.971,26.007
  Bottom Layer w0.381: U5.16@16.816,14.462 C31.2@18.821,14.462 ; C39.2@40.732,26.219 C38.2@41.829,26.219 ; C38.2@41.899,26.225 v1(41.899,27.22) ; v1(53.035,17.348) 55.038,17.348 ccw(c55.038,17.731) 55.42,17.731 55.42,18.069 C16.2@55.422,18.387
  Bottom Layer w0.508: R19.2@56.946,26.032 v1(56.946,27.227)
  Bottom Layer w0.635: R87.2@6.783,3.655 v1(7.874,3.655) R88.2@9.008,3.655
3V3DC: C15.2 C30.2 J7.3 R3.1 R18.2 R21.2 U4.1 U5.1 | length 92.7
  Top Layer w0.508: v1@61.239,18.383 U4.1@62.71,18.383
  Top Layer w0.762: v1(5.221,24.7) 7.624,24.7 ccw(c7.624,25.499) 8.424,25.499 v1(8.424,32.512)
  GND2 w0.254: 8.424,31.2 v1(8.424,32.512) ; 27.051,30.48 cw(c27.051,29.591) 27.94,29.591 ccw(c28.68,29.591) 28.68,28.851 35.204,28.851 ccw(c35.204,29.397) 35.75,29.397 35.75,31.906 cw(c36.315,31.906) 36.315,32.471 42.245,32.471 cw(c42.245,31.537) 42.899,32.204 cw(c42.245,31.537) 43.18,31.537 43.18,29.941 cw(c42.65,29.941) 42.65,29.411 J7.3@41.684,29.411
  Bottom Layer w0.508: C30.2@4.925,14.325 5.056,14.457 8.644,14.457 ccw(c8.644,15.088) 9.275,15.088 9.275,24.011 ccw(c8.587,24.011) 8.587,24.7 v1@5.232,24.7 ; v1(8.424,32.512) 12.446,32.512 cw(c12.446,31.899) 13.059,31.899 R3.1@13.059,31.166 ; C15.2@58.724,18.387 v1(61.239,18.387)
  Bottom Layer w0.635: R21.2@5.221,23.612 v1(5.221,24.7) ; J7.3@41.684,29.411 57.711,29.411 cw(c57.711,28.398) 58.724,28.398 R18.2@58.724,26.007 C15.2@58.724,18.387
5VDC: C5.2 C6.2 C12.2 C13.2 C62.2 D9.2 D10.2 J9.1 K1.1 K1.10 U1.4 U2.1 U2.2 U6.1 | length 128.1
  Top Layer w0.508: K1.10@59.359,67.43 ccw(c59.56,67.43) 59.56,67.229 D10.2@62.67,67.229 v1@63.754,67.229 ; K1.1@59.359,77.59 62.063,77.59 ; D9.2@62.67,75.56 62.67,76.983 ccw(c62.063,76.983) 62.063,77.59 ; v1(63.83,67.229) 63.83,76.879 ccw(c63.12,76.879) 63.12,77.59 62.063,77.59
  GND2 w0.254: U6.1@25.944,6.011 25.944,4.578 ccw(c26.58,4.578) 26.58,3.941 55.77,3.941 ; 55.77,5.78 55.77,3.941 ; 55.77,5.781 cw(c56.411,5.781) 56.128,6.355 cw(c56.239,6.127) 56.239,6.381 J9.1@57.708,6.381 ; v1@63.83,66.954 63.83,11.18 64.034,10.977 64.034,4.875 cw(c63.1,4.875) 63.1,3.941 55.77,3.941
+3V3: C9.2 C10.2 C11.2 R3.2 R16.2 R17.2 U2.4 U3.1 | length 62.3
  Top Layer w0.381: v1(39.555,19.46) 39.555,20.045 cw(c39.942,20.045) 39.942,20.432 U3.1@40.586,20.432
  GND2 w0.254: v1(14.258,29.642) v1(15.239,29.642) v1(16.219,29.642) 16.989,29.642 cw(c16.989,28.851) 17.78,28.851 17.78,16.773 ccw(c18.826,16.773) 18.826,15.727 39.562,15.727 ; v1(39.555,19.46) 39.562,19.46 39.562,15.727 ; v1(45.995,19.46) 45.995,16.53 cw(c45.192,16.53) 45.192,15.727 39.562,15.727
  Bottom Layer w0.381: R17.2@39.474,21.394 38.31,21.394 ccw(c38.31,20.93) 37.846,20.93 37.846,19.973 ccw(c38.359,19.973) 38.359,19.46 v1(39.555,19.46) ; R16.2@44.101,21.394 45.522,21.394 cw(c45.522,20.921) 45.995,20.921 v1(45.995,19.46)
AD_GND: C16.1 C21.1 C28.1 C29.1 C31.1 C32.1 C33.1 C34.1 C35.1 C36.1 C37.1 C38.1 C39.1 C40.1 C41.1 C42.1 C43.1 C44.2 C45.2 C46.1 C47.1 C48.1 C49.2 C50.2 C51.1 C52.1 C53.1 C54.2 C55.2 C56.1 C57.1 C63.1 D1.3 D2.3 D3.3 D4.3 D5.3 D6.3 FB15.2 LED1.2 LED2.2 LED3.2 LED4.2 R13.1 R14.1 R27.1 R30.1 R36.1 R37.2 R46.1 R47.1 R48.2 R56.1 R59.1 R60.2 R67.1 R73.1 R77.1 R79.2 SB1.1 U3.2 U3.15 U3.17 U3.18 U3.26 U3.28 U3.41 U4.9 U4.15 U5.9 U5.15 U6.4 X1.2 X1.4 | length 125
  Top Layer w0.254: v1(11.233,8.763) v1(13.458,8.763) v1(15.683,8.763) v1(17.901,8.763) 22.291,8.763 ccw(c22.291,9.84) 23.368,9.84 23.368,14.478 ; U3.41@41.185,21.567 cw(c41.185,21.537) 41.216,21.537 U3.2@41.216,20.432 ; U3.41@41.716,25.143 U3.28@41.716,26.247 ; U3.41@42.716,25.143 U3.26@42.716,26.247 ; U3.41@44.769,23.09 U3.15@45.873,23.09 ; U3.41@44.769,24.09 U3.17@45.873,24.09 ; U3.41@44.769,24.59 U3.18@45.873,24.59 ; R79.2@48.932,22.888 v1(48.932,24.737)
  Top Layer w0.381: R77.1@48.932,21.79 R79.2@48.932,22.888 ; R14.1@51.052,23.26 R14.1@51.052,23.264 v1(51.052,23.963)
  Top Layer w0.508: v1@30.746,30.504 32.423,30.504 C28.1@32.447,30.528 X1.2@34.133,30.528 ; X1.4@36.428,29.004 v1(37.352,29.004) C29.1@38.114,29.004 ; R13.1@51.142,19.657 U4.15@52.96,19.657 v1(55.806,19.657) ; U4.9@52.96,27.277 v1(54.431,27.277)
  Top Layer w0.635: v1@32.106,9.493 D1.3@34.03,9.493 ; v1(32.106,9.506) 32.106,10.881 ; v1(32.106,18.911) 32.106,13.752 ; C41.1@33.471,10.868 C41.1@33.598,10.881 32.106,10.881 ; C42.1@33.471,13.752 32.106,13.752 ; D6.3@51.784,9.48 v1@53.709,9.48 ; C54.2@52.216,10.868 53.709,10.868 ; C55.2@52.343,13.738 53.024,13.738 cw(c53.024,13.053) 53.709,13.053 v1(53.709,9.493) ; 32.106,10.881 32.106,13.752
  Top Layer w0.762: v1(23.368,18.923) 23.368,14.478 ccw(c24.215,14.478) 24.215,13.631 U6.4@25.944,13.631
  Bottom Layer w0.254: 25.412,37.985 cw(c25.527,37.985) 25.527,38.1
  Bottom Layer w0.381: v1(55.806,19.657) 56.946,19.657
  Bottom Layer w0.508: LED1.2@11.233,7.961 v1(11.233,8.763) ; LED2.2@13.458,7.961 v1(13.458,8.763) ; LED3.2@15.683,7.961 v1(15.683,8.763) ; U5.9@16.811,23.347 15.39,23.347 ccw(c15.39,22.671) 14.714,22.671 14.714,16.397 ccw(c15.384,16.397) 15.384,15.727 U5.15@16.811,15.727 C31.1@18.826,15.727 ; LED4.2@17.901,8.036 v1(17.901,8.763) ; C31.1@18.953,15.854 19.132,15.675 25.712,15.675 C63.1@25.944,15.443 ; C16.1@56.946,18.387 56.946,19.657 SB1.1@56.946,23.467
  Bottom Layer w1.016: 33.883,39.775 FB15.2@33.883,65.322
  other v1: 39.388,10.004 46.388,10.004 41.533,22.403 42.488,22.403 43.443,22.403 44.398,22.403 41.533,23.358 42.488,23.358 43.443,23.358 44.398,23.358 41.533,24.313 42.488,24.313 43.443,24.313 44.398,24.313 30.743,30.507 24.446,37.502 25.412,37.502 24.446,38.467 25.412,38.467 24.446,39.432 25.412,39.432